# Altium PCB main_ADC_PCB.PcbDoc (part 6 of 8)
Units mm, origin at the board's own origin, x right, y up, seen from the top; angles counter-clockwise.
Board outline 150 x 100 mm, 4 copper layers (Top Layer, Layer 1, Layer 2, Bottom Layer), stack 1.62 mm thick; 535 components, 354 nets, 1725 pads, 1075 vias.
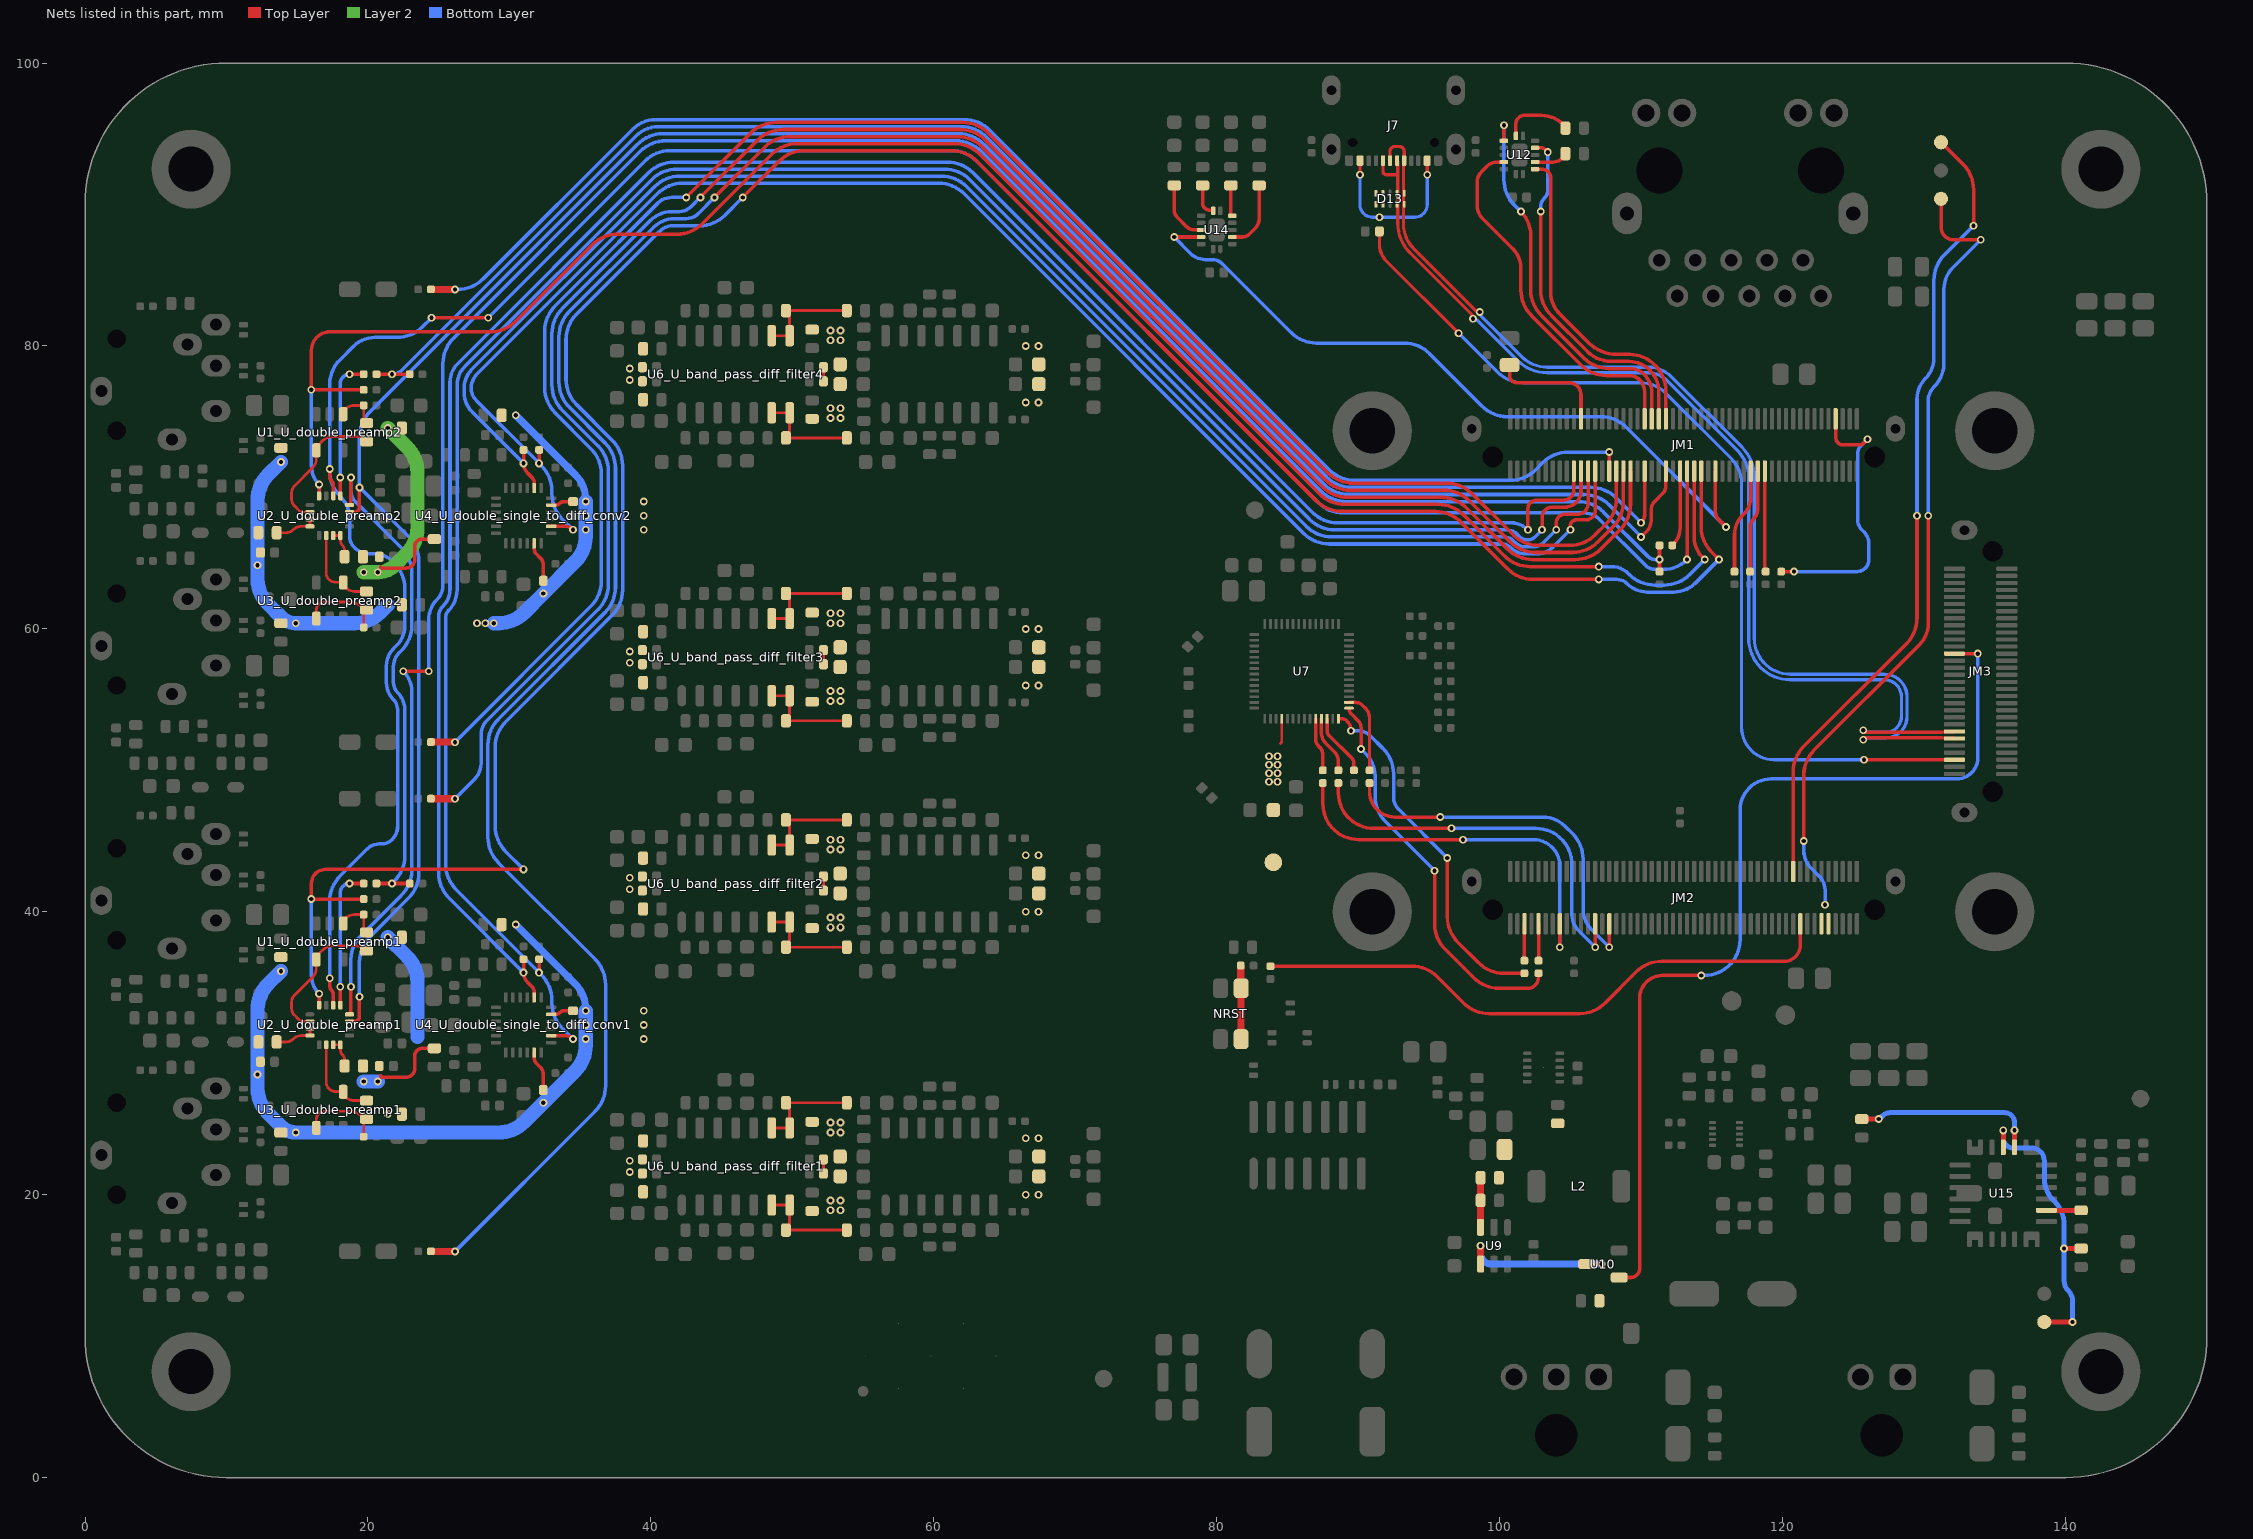
[diagram p8: the nets of this part, all layers, seen from the top]

## Via types
v1: diameter 0.55, hole 0.3, Top Layer to Bottom Layer, tented both sides, 1011 vias
v2: diameter 1, hole 0.6, Top Layer to Bottom Layer, 64 vias

## Nets (pads, with @x,y where several pads share a name; then routed paths per layer and width w, separated by ;. In a path a pad name is that pad's centre, name@x,y a point inside that pad or via, vN(x,y) a via of type N, cw(c..) or ccw(c..) an arc to the next point about the centre after c; other vN are vias at no path point) (continued)
NetJM1_41: JM1.41 U14.12 | length 53.1
  Top Layer w0.25: v1(77,87.7) U14.12@78.9,87.7 ; JM1.41@115.25,71.15 115.25,68.304 ccw(c116.104,68.304) 115.5,67.7 v1(116,67.2)
  Bottom Layer w0.25: v1(77,87.7) 78.176,86.524 ccw(c79.2,87.549) 79.2,86.1 79.676,86.1 cw(c79.676,85.076) 80.4,85.8 85.256,80.944 ccw(c87.052,82.74) 87.052,80.2 93.248,80.2 cw(c93.248,77.66) 95.044,79.456 98.756,75.744 ccw(c100.552,77.54) 100.552,75 107.148,75 cw(c107.148,72.46) 108.944,74.256 v1(116,67.2)
NetJM1_45: JM1.45 R15_U_double_preamp1.1 U2_U_double_preamp1.16 | length 178.3
  Top Layer w0.25: U2_U_double_preamp1.16@16.55,33.4 v1(16.55,34.2) ; R15_U_double_preamp1.1@19.7,40.9 v1(16,40.9) 16,42 cw(c17,42) 17,43 v1(31,43) ; v1(46.5,90.5) 49.056,93.056 cw(c50.852,91.26) 50.852,93.8 61.248,93.8 cw(c61.248,91.26) 63.044,93.056 87.056,69.044 ccw(c88.852,70.84) 88.852,68.3 95.448,68.3 cw(c95.448,65.76) 97.244,67.556 100.556,64.244 ccw(c102.352,66.04) 102.352,63.5 v1(107,63.5) ; JM1.45@114.25,71.15 114.25,67.202 ccw(c116.79,67.202) 114.994,65.406 v1(115.5,64.9)
  Bottom Layer w0.25: v1(16,40.9) 16,35.528 ccw(c17.878,35.528) v1(16.55,34.2) ; v1(31,43) 29.744,44.256 cw(c31.54,46.052) 29,46.052 29,51.648 cw(c31.54,51.648) 29.744,53.444 37.256,60.956 ccw(c35.46,62.752) 38,62.752 38,71.548 ccw(c35.46,71.548) 37.256,73.344 34.744,75.856 cw(c36.54,77.652) 34,77.652 34,80.448 cw(c36.54,80.448) 34.744,82.244 40.576,88.076 cw(c41.6,87.051) 41.6,88.5 43.448,88.5 ccw(c43.448,91.04) 45.244,89.244 v1(46.5,90.5) ; v1(107,63.5) 108.276,63.5 cw(c108.276,62.476) 109,63.2 ccw(c110.449,64.649) 110.449,62.6 112.289,62.6 ccw(c112.289,64.799) 113.844,63.244 v1(115.5,64.9)
NetJM1_47: JM1.47 R15_U_double_preamp2.1 U2_U_double_preamp2.16 | length 137.9
  Top Layer w0.25: U2_U_double_preamp2.16@16.55,69.4 v1(16.55,70.2) ; R15_U_double_preamp2.1@19.7,76.9 v1(16,76.9) 16,79.7 cw(c17.3,79.7) 17.3,81 28.648,81 ccw(c28.648,83.54) 30.444,81.744 35.856,87.156 cw(c37.652,85.36) 37.652,87.9 41.848,87.9 ccw(c41.848,90.44) 43.644,88.644 48.556,93.556 cw(c50.352,91.76) 50.352,94.3 61.448,94.3 cw(c61.448,91.76) 63.244,93.556 87.256,69.544 ccw(c89.052,71.34) 89.052,68.8 95.648,68.8 cw(c95.648,66.26) 97.444,68.056 100.356,65.144 ccw(c102.152,66.94) 102.152,64.4 v1(107,64.4) ; JM1.47@113.75,71.15 113.75,66.521 ccw(c115.852,66.521) 114.366,65.034 v1(114.5,64.9)
  Bottom Layer w0.25: v1(16,76.9) 16,71.528 ccw(c17.878,71.528) v1(16.55,70.2) ; v1(107,64.4) 107.893,64.4 cw(c107.893,62.693) 109.1,63.9 109.156,63.844 ccw(c110.952,65.64) 110.952,63.1 111.648,63.1 ccw(c111.648,65.64) 113.444,63.844 v1(114.5,64.9)
NetJM1_51: JM1.51 R126.2 | length 5.4
  Top Layer w0.25: R126.2@112.2,65.9 112.271,65.971 ccw(c111.114,67.128) 112.75,67.128 JM1.51@112.75,71.15
NetJM1_56: JM1.56 U12.2 | length 23.3
  Top Layer w0.25: U12.2@102.5,92.5 103,92.5 cw(c103,91.9) 103.6,91.9 103.6,83.852 ccw(c105.874,83.852) 104.265,82.245 106.263,80.247 ccw(c108.308,82.292) 108.308,79.4 108.31,79.4 109.2,79.4 cw(c109.2,76.937) 110.941,78.679 110.99,78.631 cw(c109.154,76.795) 111.75,76.795 JM1.56@111.75,74.85
NetJM1_58: JM1.58 U12.5 | length 24.8
  Top Layer w0.25: U12.5@102.5,94 102.959,94 cw(c102.959,93.659) 103.2,93.9 v1(103.4,93.7) ; v1(102.9,89.5) 102.9,83.952 ccw(c105.44,83.952) 103.644,82.156 106.186,79.614 ccw(c107.879,81.305) 107.881,78.912 109.123,78.912 cw(c109.123,76.823) 110.6,78.3 cw(c109.031,76.731) 111.25,76.731 JM1.58@111.25,74.85
  Bottom Layer w0.25: v1@102.9,89.6 102.9,89.776 cw(c103.924,89.776) 103.2,90.5 ccw(c102.717,90.983) 103.4,90.983 v1(103.4,93.7)
NetJM1_60: JM1.60 U12.9 | length 27.4
  Top Layer w0.25: U12.9@100.3,94.5 v1(100.3,95.6) ; v1(101.5,89.5) cw(c99.81,87.81) 102.2,87.81 102.2,83.952 ccw(c104.74,83.952) 102.944,82.156 105.956,79.144 ccw(c107.752,80.94) 107.752,78.4 109.234,78.4 cw(c109.234,77.034) 110.2,78 cw(c108.872,76.672) 110.75,76.672 JM1.60@110.75,74.85
  Bottom Layer w0.25: v1(100.3,95.6) 100.3,91.752 ccw(c102.84,91.752) 101.044,89.956 v1(101.5,89.5)
NetJM1_62: JM1.62 U12.12 | length 25.6
  Top Layer w0.25: U12.12@100.3,93 99.824,93 ccw(c99.824,91.976) 99.1,92.7 98.754,92.354 ccw(c99.607,91.5) 98.4,91.5 98.4,89.966 ccw(c99.766,89.966) 98.8,89 100.934,86.866 cw(c99.569,85.5) 101.5,85.5 101.5,83.952 ccw(c104.04,83.952) 102.244,82.156 105.756,78.644 ccw(c107.552,80.44) 107.552,77.9 109.176,77.9 cw(c109.176,76.876) 109.9,77.6 cw(c109.055,76.755) 110.25,76.755 JM1.62@110.25,74.85
NetJM1_65: JM1.65 R120.1 | length 177
  Top Layer w0.25: v1(44.5,90.5) 48.056,94.056 cw(c49.852,92.26) 49.852,94.8 61.648,94.8 cw(c61.648,92.26) 63.444,94.056 87.456,70.044 ccw(c89.252,71.84) 89.252,69.3 95.848,69.3 cw(c95.848,66.76) 97.644,68.556 100.556,65.644 ccw(c102.352,67.44) 102.352,64.9 105.348,64.9 ccw(c105.348,67.44) 107.144,65.644 108.506,67.006 ccw(c106.71,68.802) 109.25,68.802 JM1.65@109.25,71.15
  Top Layer w0.5: R120.1@24.474,15.99 v1(26.15,15.99)
  Bottom Layer w0.25: v1(26.15,15.99) 36.056,25.896 ccw(c34.26,27.692) 36.8,27.692 36.8,34.848 ccw(c34.26,34.848) 36.056,36.644 29.221,43.479 cw(c31.017,45.275) 28.477,45.275 28.477,51.825 cw(c31.017,51.825) 29.221,53.621 36.756,61.156 ccw(c34.96,62.952) 37.5,62.952 37.5,71.348 ccw(c34.96,71.348) 36.756,73.144 34.244,75.656 cw(c36.04,77.452) 33.5,77.452 33.5,80.648 cw(c36.04,80.648) 34.244,82.444 40.164,88.364 cw(c41.7,86.827) 41.7,89 42.5,89 ccw(c42.5,90.207) 43.354,89.354 v1(44.5,90.5)
NetJM1_67: JM1.67 R118.1 | length 138.2
  Top Layer w0.25: v1(43.5,90.5) 47.556,94.556 cw(c49.352,92.76) 49.352,95.3 61.848,95.3 cw(c61.848,92.76) 63.644,94.556 87.656,70.544 ccw(c89.452,72.34) 89.452,69.8 96.048,69.8 cw(c96.048,67.26) 97.844,69.056 100.756,66.144 ccw(c102.552,67.94) 102.552,65.4 105.148,65.4 ccw(c105.148,67.94) 106.944,66.144 108.006,67.206 ccw(c106.21,69.002) 108.75,69.002 JM1.67@108.75,71.15
  Top Layer w0.5: R118.1@24.474,47.99 v1(26.15,47.99)
  Bottom Layer w0.25: v1(26.15,47.99) 27.533,49.373 ccw(c26.407,50.5) 28,50.5 28,52.534 cw(c29.366,52.534) 28.4,53.5 36.256,61.356 ccw(c34.46,63.152) 37,63.152 37,71.148 ccw(c34.46,71.148) 36.256,72.944 33.744,75.456 cw(c35.54,77.252) 33,77.252 33,80.848 cw(c35.54,80.848) 33.744,82.644 39.964,88.864 cw(c41.5,87.327) 41.5,89.5 42,89.5 ccw(c42,90.707) 42.854,89.854 v1(43.5,90.5)
NetJM1_69: JM1.69 R79.1 | length 134.2
  Top Layer w0.25: v1(42.5,90.5) 47.056,95.056 cw(c48.852,93.26) 48.852,95.8 62.048,95.8 cw(c62.048,93.26) 63.844,95.056 87.856,71.044 ccw(c89.652,72.84) 89.652,70.3 96.248,70.3 cw(c96.248,67.76) 98.044,69.556 100.956,66.644 ccw(c102.752,68.44) 102.752,65.9 104.948,65.9 ccw(c104.948,68.44) 106.744,66.644 107.506,67.406 ccw(c105.71,69.202) 108.25,69.202 JM1.69@108.25,71.15
  Top Layer w0.5: R79.1@24.474,51.99 v1(26.15,51.99)
  Bottom Layer w0.25: v1(26.15,51.99) 35.756,61.596 ccw(c33.96,63.392) 36.5,63.392 36.5,70.948 ccw(c33.96,70.948) 35.756,72.744 33.244,75.256 cw(c35.04,77.052) 32.5,77.052 32.5,81.048 cw(c35.04,81.048) 33.244,82.844 34.9,84.5 40.5,90.1 cw(c41.466,89.134) 41.466,90.5 v1(42.5,90.5)
NetJM1_71: JM1.71 R77.1 | length 100.3
  Top Layer w0.245: JM1.71@107.75,71.15 v1(107.75,72.5)
  Top Layer w0.5: R77.1@24.474,83.99 v1(26.15,83.99)
  Bottom Layer w0.25: v1(26.15,83.99) 26.338,83.99 ccw(c26.338,86.53) 28.134,84.734 38.727,95.327 cw(c40.352,93.701) 40.352,96 62.148,96 cw(c62.148,93.46) 63.944,95.256 87.956,71.244 ccw(c89.752,73.04) 89.752,70.5 100.748,70.5 ccw(c100.748,73.04) 102.544,71.244 103.056,71.756 cw(c104.852,69.96) 104.852,72.5 v1(107.75,72.5)
NetJM1_75: JM1.75 R33_U_double_single_to_diff_conv2.1 U4_U_double_single_to_diff_conv2.14 | length 115.5
  Top Layer w0.25: v1(32.1,71.7) R33_U_double_single_to_diff_conv2.1@32.1,72.65 ; U4_U_double_single_to_diff_conv2.14@32.952,67.25 33.896,67.25 cw(c33.896,66.396) v1(34.5,67) ; v1(105,67) 105,67.3 cw(c105.4,67.3) 105.4,67.7 106.1,67.7 ccw(c106.1,68.35) 106.75,68.35 JM1.75@106.75,71.15
  Bottom Layer w0.25: v1(32.1,71.7) 27.654,76.146 cw(c28.507,77) 27.3,77 cw(c28.749,77) 27.724,78.024 40.456,90.756 cw(c42.252,88.96) 42.252,91.5 60.348,91.5 cw(c60.348,88.96) 62.144,90.756 86.156,66.744 ccw(c87.952,68.54) 87.952,66 100.217,66 cw(c100.217,65.317) 100.7,65.8 100.705,65.795 ccw(c101.9,66.99) 101.9,65.3 ; v1@32.256,71.544 cw(c30.46,69.748) 33,69.748 33,69.552 ccw(c35.54,69.552) 33.744,67.756 v1(34.5,67) ; 101.983,65.3 102.6,65.3 ccw(c102.6,66.99) 103.795,65.795 v1(105,67)
NetJM1_77: JM1.77 R20_U_double_single_to_diff_conv2.2 U4_U_double_single_to_diff_conv2.20 | length 110.4
  Top Layer w0.25: R20_U_double_single_to_diff_conv2.2@31,72.65 v1(31,71.7) ccw(c31.966,71.7) 31.283,71.017 31.6,70.7 cw(c31.238,70.338) 31.75,70.338 U4_U_double_single_to_diff_conv2.20@31.75,69.952 ; v1(104,67) 104,67.5 cw(c104.6,67.5) 104.6,68.1 105.5,68.1 ccw(c105.5,68.85) 106.25,68.85 JM1.77@106.25,71.15
  Bottom Layer w0.25: v1(31,71.7) 27.366,75.334 cw(c28.731,76.7) 26.8,76.7 26.8,77.029 cw(c28.661,77.029) 27.345,78.345 40.256,91.256 cw(c42.052,89.46) 42.052,92 60.53,92 cw(c60.53,89.46) 62.326,91.256 86.338,67.244 ccw(c88.134,69.04) 88.134,66.5 100.317,66.5 cw(c100.317,65.576) 100.971,66.229 101.1,66.1 ccw(c101.824,66.824) 101.824,65.8 102.4,65.8 ccw(c102.4,66.766) 103.083,66.083 v1(104,67)
NetJM1_79: JM1.79 R33_U_double_single_to_diff_conv1.1 U4_U_double_single_to_diff_conv1.14 | length 152.6
  Top Layer w0.25: v1(32.1,35.7) R33_U_double_single_to_diff_conv1.1@32.1,36.65 ; U4_U_double_single_to_diff_conv1.14@32.952,31.25 33.896,31.25 cw(c33.896,30.396) v1(34.5,31) ; v1(103,67) 103,67.9 cw(c103.7,67.9) 103.7,68.6 104.6,68.6 ccw(c104.6,69.75) 105.75,69.75 JM1.79@105.75,71.15
  Bottom Layer w0.25: v1(34.5,31) 33.744,31.756 cw(c35.54,33.552) 33,33.552 33,33.748 ccw(c30.46,33.748) 32.256,35.544 v1(32.1,35.7) 26.244,41.556 cw(c28.04,43.352) 25.5,43.352 25.5,60.817 cw(c26.183,60.817) 25.7,61.3 ccw(c24.251,62.749) 26.3,62.749 26.3,77.231 cw(c28.157,77.231) 26.844,78.544 40.056,91.756 cw(c41.852,89.96) 41.852,92.5 60.748,92.5 cw(c60.748,89.96) 62.544,91.756 86.556,67.744 ccw(c88.352,69.54) 88.352,67 100.476,67 cw(c100.476,65.919) 101.223,66.7 ; 101.223,66.7 cw(c101.05,66.52) 101.25,66.669 ccw(c101.964,67.195) 101.556,66.408 ccw(c102,67.266) 102,66.3 ccw(c102,67.024) 102.513,66.513 v1(103,67)
NetJM1_81: JM1.81 R20_U_double_single_to_diff_conv1.2 U4_U_double_single_to_diff_conv1.20 | length 147.5
  Top Layer w0.25: R20_U_double_single_to_diff_conv1.2@31,36.65 v1(31,35.7) ccw(c31.966,35.7) 31.283,35.017 31.6,34.7 cw(c31.238,34.338) 31.75,34.338 U4_U_double_single_to_diff_conv1.20@31.75,33.952 ; v1(102,67) 102,68.5 cw(c102.6,68.5) 102.6,69.1 104.5,69.1 ccw(c104.5,69.85) 105.25,69.85 JM1.81@105.25,71.15
  Bottom Layer w0.25: v1(31,35.7) 25.744,40.956 cw(c27.54,42.752) 25,42.752 25,60.876 cw(c26.024,60.876) 25.3,61.6 ccw(c24.093,62.807) 25.8,62.807 25.8,77.431 cw(c27.657,77.431) 26.344,78.744 39.856,92.256 cw(c41.652,90.46) 41.652,93 60.948,93 cw(c60.948,90.46) 62.744,92.256 86.756,68.244 ccw(c88.552,70.04) 88.552,67.5 100.793,67.5 cw(c100.793,65.793) v1(102,67)
NetJM2_9: JM2.9 JM2.11 PWR_M1.1 | length 57.5
  Top Layer w0.25: v1(121.5,45) 121.5,49.648 cw(c124.04,49.648) 122.244,51.444 129.656,58.856 ccw(c128.101,60.411) 130.3,60.411 v1(130.3,68) ; PWR_M1.1@131.2,90.4 131.2,88.4 ccw(c132.1,88.4) 132.1,87.5 v1(134,87.5)
  Bottom Layer w0.25: v1(121.5,45) 121.5,44.3 ccw(c123.19,44.3) 121.995,43.105 122.6,42.5 cw(c121.634,41.534) 123,41.534 v1(123,40.5) ; v1(130.3,68) 130.3,76.134 cw(c131.666,76.134) 130.7,77.1 ccw(c129.01,78.79) 131.4,78.79 131.4,84 cw(c133.573,84) 132.036,85.536 v1(134,87.5)
NetJM2_17: JM2.17 R110.1 | length 42.1
  Top Layer w0.245: R110.1@83.8,36.15 93.798,36.15 cw(c93.798,33.61) 95.594,35.406 97.456,33.544 ccw(c99.252,35.34) 99.252,32.8 105.648,32.8 ccw(c105.648,35.34) 107.444,33.544 109.656,35.756 cw(c111.452,33.96) 111.452,36.5 120.1,36.5 ccw(c120.1,37.65) 121.25,37.65 JM2.17@121.25,39.15
NetJM2_20: JM2.20 PWR_M3.1 | length 57.2
  Top Layer w0.25: JM2.20@120.75,42.85 120.75,49.898 cw(c123.29,49.898) 121.494,51.694 128.756,58.956 ccw(c126.96,60.752) 129.5,60.752 v1(129.5,68) ; PWR_M3.1@131.2,94.4 132.756,92.844 cw(c130.96,91.048) 133.5,91.048 v1(133.5,88.5)
  Bottom Layer w0.25: v1(129.5,68) 129.5,76.251 cw(c131.549,76.251) 130.1,77.7 ccw(c128.651,79.149) 130.7,79.149 130.7,84.648 cw(c133.24,84.648) 131.444,86.444 v1(133.5,88.5)
NetJM3_26: JM3.26 U10.1 | length 67.5
  Top Layer w0.25: U10.1@108.45,14.15 109.25,14.15 ccw(c109.25,14.8) 109.9,14.8 109.9,33.9 cw(c111.5,33.9) 111.5,35.5 v1@114.3,35.5 ; JM3.26@132.15,58.25 v1(133.8,58.25)
  Bottom Layer w0.25: v1(114.25,35.5) 114.46,35.5 ccw(c114.46,38.04) 117,38.04 117,47.2 cw(c119.2,47.2) 119.2,49.4 132.3,49.4 ccw(c132.3,50.9) 133.8,50.9 v1(133.8,58.25)
NetPG_1: PG.1 R114.2 U15.4 | length 20.7
  Top Layer w0.35: U15.4@135.6,23.35 v1(135.6,24.55) ; PG.1@138.5,11 v1(140.5,11) ; v1(139.9,16.2) R114.2@141.1,16.2
  Bottom Layer w0.35: v1(135.6,24.55) 135.6,24 ccw(c136.3,24) 136.3,23.3 137.6,23.3 cw(c137.6,22.4) 138.5,22.4 138.5,21.166 ccw(c140.724,21.166) 139.15,19.594 139.216,19.528 cw(c137.565,17.877) 139.9,17.877 v1(139.9,16.2) 139.9,13.924 ccw(c140.924,13.924) 140.2,13.2 cw(c139.476,12.476) 140.5,12.476 v1(140.5,11)
NetR7_U_double_preamp1_2: R7_U_double_preamp1.2 R11_U_double_preamp1.1 U1_U_double_preamp1.1 | length 2.6
  Top Layer w0.2: U1_U_double_preamp1.1@18.393,39.526 cw(c19.054,38.864) 19.054,39.8 R7_U_double_preamp1.2@19.7,39.8 19.7,38.635 cw(c19.66,38.635) R11_U_double_preamp1.1@19.688,38.607
NetR7_U_double_preamp2_2: R7_U_double_preamp2.2 R11_U_double_preamp2.1 U1_U_double_preamp2.1 | length 2.6
  Top Layer w0.2: U1_U_double_preamp2.1@18.393,75.526 cw(c19.054,74.864) 19.054,75.8 R7_U_double_preamp2.2@19.7,75.8 19.7,74.635 cw(c19.66,74.635) R11_U_double_preamp2.1@19.688,74.607
NetR11_U_double_preamp1_2: R11_U_double_preamp1.2 U1_U_double_preamp1.4 U2_U_double_preamp1.2 | length 10
  Top Layer w0.2: U2_U_double_preamp1.2@15.9,32.25 15.462,32.25 cw(c15.462,32.762) 15.1,32.4 14.799,32.701 14.798,32.702 cw(c15.273,33.179) 14.6,33.181 14.6,33.615 cw(c15.283,33.617) 14.8,34.1 16.1,35.4 ccw(c15.496,36.004) 16.35,36.004 U1_U_double_preamp1.4@16.35,36.625 cw(c16.893,36.625) 16.509,37.009 16.8,37.3 cw(c17.524,36.576) 17.524,37.6 19.055,37.6 cw(c19.055,36.405) R11_U_double_preamp1.2@19.9,37.25
NetR11_U_double_preamp2_2: R11_U_double_preamp2.2 U1_U_double_preamp2.4 U2_U_double_preamp2.2 | length 10
  Top Layer w0.2: U2_U_double_preamp2.2@15.9,68.25 15.462,68.25 cw(c15.462,68.762) 15.1,68.4 14.799,68.701 14.798,68.702 cw(c15.273,69.179) 14.6,69.181 14.6,69.615 cw(c15.283,69.617) 14.8,70.1 16.1,71.4 ccw(c15.496,72.004) 16.35,72.004 U1_U_double_preamp2.4@16.35,72.625 cw(c16.893,72.625) 16.509,73.009 16.8,73.3 cw(c17.524,72.576) 17.524,73.6 19.055,73.6 cw(c19.055,72.405) R11_U_double_preamp2.2@19.9,73.25
NetR14_U_double_preamp1_1: R14_U_double_preamp1.1 U2_U_double_preamp1.3 U2_U_double_preamp1.4 | length 3
  Top Layer w0.2: R14_U_double_preamp1.1@13.55,30.8 14.217,30.8 ccw(c14.217,31.483) 14.7,31 cw(c15.304,30.396) 15.304,31.25 U2_U_double_preamp1.4@15.9,31.25 U2_U_double_preamp1.3@15.9,31.75
NetR14_U_double_preamp2_1: R14_U_double_preamp2.1 U2_U_double_preamp2.3 U2_U_double_preamp2.4 | length 3
  Top Layer w0.2: R14_U_double_preamp2.1@13.55,66.8 14.217,66.8 ccw(c14.217,67.483) 14.7,67 cw(c15.304,66.396) 15.304,67.25 U2_U_double_preamp2.4@15.9,67.25 U2_U_double_preamp2.3@15.9,67.75
NetR16_U_double_preamp1_1: R16_U_double_preamp1.1 U2_U_double_preamp1.7 U2_U_double_preamp1.8 | length 2.1
  Top Layer w0.2: U2_U_double_preamp1.7@17.55,30.6 U2_U_double_preamp1.8@18.05,30.6 18.05,30.262 ccw(c18.562,30.262) 18.2,29.9 cw(c17.838,29.538) 18.35,29.538 R16_U_double_preamp1.1@18.35,29.1
NetR16_U_double_preamp2_1: R16_U_double_preamp2.1 U2_U_double_preamp2.7 U2_U_double_preamp2.8 | length 2.1
  Top Layer w0.2: U2_U_double_preamp2.7@17.55,66.6 U2_U_double_preamp2.8@18.05,66.6 18.05,66.262 ccw(c18.562,66.262) 18.2,65.9 cw(c17.838,65.538) 18.35,65.538 R16_U_double_preamp2.1@18.35,65.1
NetR18_U_double_preamp1_2: R18_U_double_preamp1.2 R121_U_double_preamp1.2 U3_U_double_preamp1.1 | length 5.7
  Top Layer w0.2: U3_U_double_preamp1.1@16.35,24.725 16.35,25.338 cw(c16.862,25.338) 16.5,25.7 cw(c16.983,25.217) 16.983,25.9 18.653,25.9 cw(c18.653,24.508) 19.638,25.492 cw(c19.487,25.342) 19.7,25.342 R18_U_double_preamp1.2@19.7,24.1
NetR18_U_double_preamp2_2: R18_U_double_preamp2.2 R121_U_double_preamp2.2 U3_U_double_preamp2.1 | length 5.7
  Top Layer w0.2: U3_U_double_preamp2.1@16.35,60.725 16.35,61.338 cw(c16.862,61.338) 16.5,61.7 cw(c16.983,61.217) 16.983,61.9 18.653,61.9 cw(c18.653,60.508) 19.638,61.492 cw(c19.487,61.342) 19.7,61.342 R18_U_double_preamp2.2@19.7,60.1
NetR34_U_band_pass_diff_filter1_1: R34_U_band_pass_diff_filter1.1 R38_U_band_pass_diff_filter1.2 U6_U_band_pass_diff_filter1.6 U6_U_band_pass_diff_filter1.7 | length 7.3
  Top Layer w0.2: U6_U_band_pass_diff_filter1.6@48.54,19.275 U6_U_band_pass_diff_filter1.7@49.81,19.275 R34_U_band_pass_diff_filter1.1@49.81,17.5 ; R34_U_band_pass_diff_filter1.1@49.55,17.5 R34_U_band_pass_diff_filter1.1@49.81,17.5 ; R38_U_band_pass_diff_filter1.2@53.85,17.5 R34_U_band_pass_diff_filter1.1@49.81,17.5
NetR34_U_band_pass_diff_filter2_1: R34_U_band_pass_diff_filter2.1 R38_U_band_pass_diff_filter2.2 U6_U_band_pass_diff_filter2.6 U6_U_band_pass_diff_filter2.7 | length 7.3
  Top Layer w0.2: U6_U_band_pass_diff_filter2.6@48.54,39.275 U6_U_band_pass_diff_filter2.7@49.81,39.275 R34_U_band_pass_diff_filter2.1@49.81,37.5 ; R34_U_band_pass_diff_filter2.1@49.55,37.5 R34_U_band_pass_diff_filter2.1@49.81,37.5 ; R38_U_band_pass_diff_filter2.2@53.85,37.5 R34_U_band_pass_diff_filter2.1@49.81,37.5
NetR34_U_band_pass_diff_filter3_1: R34_U_band_pass_diff_filter3.1 R38_U_band_pass_diff_filter3.2 U6_U_band_pass_diff_filter3.6 U6_U_band_pass_diff_filter3.7 | length 7.3
  Top Layer w0.2: U6_U_band_pass_diff_filter3.6@48.54,55.275 U6_U_band_pass_diff_filter3.7@49.81,55.275 R34_U_band_pass_diff_filter3.1@49.81,53.5 ; R34_U_band_pass_diff_filter3.1@49.55,53.5 R34_U_band_pass_diff_filter3.1@49.81,53.5 ; R38_U_band_pass_diff_filter3.2@53.85,53.5 R34_U_band_pass_diff_filter3.1@49.81,53.5
NetR34_U_band_pass_diff_filter4_1: R34_U_band_pass_diff_filter4.1 R38_U_band_pass_diff_filter4.2 U6_U_band_pass_diff_filter4.6 U6_U_band_pass_diff_filter4.7 | length 7.3
  Top Layer w0.2: U6_U_band_pass_diff_filter4.6@48.54,75.275 U6_U_band_pass_diff_filter4.7@49.81,75.275 R34_U_band_pass_diff_filter4.1@49.81,73.5 ; R34_U_band_pass_diff_filter4.1@49.55,73.5 R34_U_band_pass_diff_filter4.1@49.81,73.5 ; R38_U_band_pass_diff_filter4.2@53.85,73.5 R34_U_band_pass_diff_filter4.1@49.81,73.5
NetR43_U_band_pass_diff_filter1_1: R43_U_band_pass_diff_filter1.1 R47_U_band_pass_diff_filter1.2 U6_U_band_pass_diff_filter1.8 U6_U_band_pass_diff_filter1.9 | length 7.3
  Top Layer w0.2: U6_U_band_pass_diff_filter1.9@48.54,24.725 U6_U_band_pass_diff_filter1.8@49.81,24.725 R43_U_band_pass_diff_filter1.1@49.81,26.5 ; R43_U_band_pass_diff_filter1.1@49.55,26.5 R43_U_band_pass_diff_filter1.1@49.81,26.5 ; R47_U_band_pass_diff_filter1.2@53.85,26.5 R43_U_band_pass_diff_filter1.1@49.81,26.5
NetR43_U_band_pass_diff_filter2_1: R43_U_band_pass_diff_filter2.1 R47_U_band_pass_diff_filter2.2 U6_U_band_pass_diff_filter2.8 U6_U_band_pass_diff_filter2.9 | length 7.3
  Top Layer w0.2: U6_U_band_pass_diff_filter2.9@48.54,44.725 U6_U_band_pass_diff_filter2.8@49.81,44.725 R43_U_band_pass_diff_filter2.1@49.81,46.5 ; R43_U_band_pass_diff_filter2.1@49.55,46.5 R43_U_band_pass_diff_filter2.1@49.81,46.5 ; R47_U_band_pass_diff_filter2.2@53.85,46.5 R43_U_band_pass_diff_filter2.1@49.81,46.5
NetR43_U_band_pass_diff_filter3_1: R43_U_band_pass_diff_filter3.1 R47_U_band_pass_diff_filter3.2 U6_U_band_pass_diff_filter3.8 U6_U_band_pass_diff_filter3.9 | length 7.3
  Top Layer w0.2: U6_U_band_pass_diff_filter3.9@48.54,60.725 U6_U_band_pass_diff_filter3.8@49.81,60.725 R43_U_band_pass_diff_filter3.1@49.81,62.5 ; R43_U_band_pass_diff_filter3.1@49.55,62.5 R43_U_band_pass_diff_filter3.1@49.81,62.5 ; R47_U_band_pass_diff_filter3.2@53.85,62.5 R43_U_band_pass_diff_filter3.1@49.81,62.5
NetR43_U_band_pass_diff_filter4_1: R43_U_band_pass_diff_filter4.1 R47_U_band_pass_diff_filter4.2 U6_U_band_pass_diff_filter4.8 U6_U_band_pass_diff_filter4.9 | length 7.3
  Top Layer w0.2: U6_U_band_pass_diff_filter4.9@48.54,80.725 U6_U_band_pass_diff_filter4.8@49.81,80.725 R43_U_band_pass_diff_filter4.1@49.81,82.5 ; R43_U_band_pass_diff_filter4.1@49.55,82.5 R43_U_band_pass_diff_filter4.1@49.81,82.5 ; R47_U_band_pass_diff_filter4.2@53.85,82.5 R43_U_band_pass_diff_filter4.1@49.81,82.5
NetR69_1: R69.1 U7.54 | length 4.4
  Top Layer w0.245: U7.54@87.8,53.65 87.8,53.083 87.8,52.8 ccw(c88.283,52.8) 87.941,52.459 89.559,50.841 cw(c89.217,50.5) 89.7,50.5 R69.1@89.7,50
NetR80_U_double_preamp1_1: R80_U_double_preamp1.1 R125.1 U2_U_double_preamp2.12 | length 35.5
  Top Layer w0.25: U2_U_double_preamp2.12@18.7,68.75 ccw(c18.7,68.85) 18.8,68.85 v1(18.8,70.7) ; R80_U_double_preamp1.1@20.6,42 v1(21.7,42) R125.1@22.95,42
  Bottom Layer w0.25: v1(18.8,70.7) 18.8,69.724 ccw(c19.824,69.724) 19.1,69 22.356,65.744 cw(c20.56,63.948) 23.1,63.948 23.1,60.252 cw(c20.56,60.252) 22.356,58.456 22.2,58.3 ccw(c23.166,57.334) 21.8,57.334 21.8,56.224 ccw(c22.824,56.224) 22.1,55.5 cw(c20.893,54.293) 22.6,54.293 22.6,43.952 cw(c20.06,43.952) 21.856,42.156 v1(21.7,42)
NetR80_U_double_preamp1_2: R80_U_double_preamp1.2 U2_U_double_preamp1.13 | length 10
  Top Layer w0.25: U2_U_double_preamp1.13@18.05,33.4 v1(18.05,34.7) ; v1(18.7,42) R80_U_double_preamp1.2@19.7,42
  Bottom Layer w0.25: v1(18.05,34.7) 18.05,41.35 cw(c18.7,41.35) v1(18.7,42)
NetR80_U_double_preamp2_2: R80_U_double_preamp2.2 U2_U_double_preamp2.13 | length 10
  Top Layer w0.25: U2_U_double_preamp2.13@18.05,69.4 v1(18.05,70.7) ; v1(18.7,78) R80_U_double_preamp2.2@19.7,78
  Bottom Layer w0.25: v1(18.05,70.7) 18.05,77.35 cw(c18.7,77.35) v1(18.7,78)
NetR81_1: R81.1 R82.2 U9.3 | length 3.5
  Top Layer w0.5: U9.3@98.65,17.7 R81.1@98.65,19.6 R82.2@98.65,21.2
NetR83_2: R83.2 U9.4 U10.3 | length 10.8
  Top Layer w0.5: U9.4@98.65,15.1 v1(98.65,16.4)
  Bottom Layer w0.5: v1(98.65,16.4) 98.65,15.85 ccw(c99.4,15.85) 99.4,15.1 v1(107.2,15.1)
NetR87_2: R87.2 U12.3 | length 2
  Top Layer w0.25: U12.3@102.5,93 103.765,93 ccw(c103.765,93.964) R87.2@104.446,93.282
NetR88_2: R88.2 U12.8 | length 4.7
  Top Layer w0.25: U12.8@101.15,94.85 101.15,95.738 cw(c101.662,95.738) 101.3,96.1 cw(c101.783,95.617) 101.783,96.3 102.951,96.3 cw(c102.951,94.142) R88.2@104.478,95.668
NetR98_2: R98.2 U14.3 | length 5
  Top Layer w0.25: U14.3@81.1,87.7 81.817,87.7 ccw(c81.817,88.383) 82.3,87.9 82.717,88.317 ccw(c82.034,89) 83,89 R98.2@83,91.35
NetR99_2: R99.2 U14.6 | length 2.2
  Top Layer w0.25: R99.2@81,91.35 81,89.3 ccw(c81.1,89.3) U14.6@81.1,89.2
NetR100_2: R100.2 U14.8 | length 2.3
  Top Layer w0.25: R100.2@79,91.35 79,90.1 ccw(c79.5,90.1) 79.5,89.6 79.7,89.6 cw(c79.7,89.55) U14.8@79.75,89.55
NetR101_2: R101.2 U14.11 | length 4.3
  Top Layer w0.25: R101.2@77,91.35 77,89.6 ccw(c77.724,89.6) 77.212,89.088 77.9,88.4 ccw(c78.383,88.883) 78.383,88.2 U14.11@78.9,88.2
NetR111_2: R111.2 U15.3 | length 13.1
  Top Layer w0.35: R111.2@125.6,25.35 v1(126.8,25.35) ; U15.3@136.4,23.35 v1(136.4,24.55)
  Bottom Layer w0.35: v1(126.8,25.35) ccw(c126.8,25.471) 126.885,25.385 127.1,25.6 cw(c127.583,25.117) 127.583,25.8 135.7,25.8 cw(c135.7,25.1) 136.4,25.1 v1(136.4,24.55)
NetR115_1: R115.1 U15.22 | length 2.5
  Top Layer w0.35: U15.22@138.65,18.9 R115.1@141.1,18.9
NetR121_U_double_preamp1_1: R121_U_double_preamp1.1 U2_U_double_preamp1.6 U3_U_double_preamp1.4 | length 5.8
  Top Layer w0.2: U2_U_double_preamp1.6@17.05,30.6 17.05,27.95 ccw(c17.7,27.95) 17.7,27.3 18.225,27.3 cw(c18.225,27.275) U3_U_double_preamp1.4@18.25,27.275 ; U3_U_double_preamp1.4@18.411,26.922 ccw(c19.067,27.578) 19.067,26.65 R121_U_double_preamp1.1@19.9,26.65
NetR121_U_double_preamp2_1: R121_U_double_preamp2.1 U2_U_double_preamp2.6 U3_U_double_preamp2.4 | length 5.8
  Top Layer w0.2: U2_U_double_preamp2.6@17.05,66.6 17.05,63.95 ccw(c17.7,63.95) 17.7,63.3 18.225,63.3 cw(c18.225,63.275) U3_U_double_preamp2.4@18.25,63.275 ; U3_U_double_preamp2.4@18.411,62.922 ccw(c19.067,63.578) 19.067,62.65 R121_U_double_preamp2.1@19.9,62.65
NOSEQ: JM1.8 R104.2 | length 19.7
  Top Layer w0.25: R104.2@119.9,64.05 v1(120.8,64.05) ; JM1.8@123.75,74.85 123.75,73.55 ccw(c124.3,73.55) 124.3,73 125.459,73 ccw(c125.459,73.341) 125.7,73.1 v1(126,73.4)
  Bottom Layer w0.25: v1(120.8,64.05) 125.25,64.05 ccw(c125.25,64.9) 126.1,64.9 126.1,66 ccw(c124.893,66) 125.746,66.854 125.6,67 cw(c126.324,67.724) 125.3,67.724 125.3,72.4 cw(c126.024,72.4) 125.512,72.912 v1(126,73.4)
NRST_BTN: NRST.1 NRST.2 R108.2 | length 5.2
  Top Layer w0.5: NRST.1@81.7,34.625 R108.2@81.7,36.2 ; NRST.2@81.725,31 NRST.1@81.725,34.6
PRE_REG_OUT: C59.1 F2.2 L2.1 R82.1
PWR_VBAT: JM1.80 R107.2 | length 8.3
  Top Layer w0.25: R107.2@100.7,78.65 100.7,77.9 ccw(c101.2,77.9) 101.2,77.4 104.9,77.4 cw(c104.9,76.55) 105.75,76.55 JM1.80@105.75,74.85
RESET: R70.2 U7.52 | length 3.8
  Top Layer w0.245: 87,52.182 ccw(c87.657,52.182) 87.192,51.718 87.292,51.618 cw(c86.791,51.117) 87.5,51.117 87.5,51.115 R70.2@87.5,50 ; 87,52.183 U7.52@87,53.65
RESET_FPGA: JM2.85 R70.1 | length 28.1
  Top Layer w0.245: R70.1@87.5,49.1 87.5,47.64 ccw(c90.04,47.64) 90.04,45.1 v1(97.4,45.1) ; v1(104.25,37.5) JM2.85@104.25,39.15
  Bottom Layer w0.245: v1(97.4,45.1) 102.4,45.1 cw(c102.4,43.25) 104.25,43.25 v1(104.25,37.5)
SC_BOOTMODE: JM1.31 R105.2 | length 7.4
  Top Layer w0.25: R105.2@116.6,64.05 116.6,66.649 ; 116.6,66.65 cw(c118.537,66.65) 117.167,68.02 117.273,68.126 ccw(c116.123,69.277) 117.75,69.277 JM1.31@117.75,71.15
SC_EN1: JM1.27 R102.2 | length 7.1
  Top Layer w0.25: JM1.27@118.75,71.15 118.75,64.171 ccw(c118.921,64.171) R102.2@118.8,64.05
SC_PGOOD: JM1.29 R103.2 | length 7.2
  Top Layer w0.25: R103.2@117.7,64.05 117.7,67.217 cw(c118.383,67.217) 117.9,67.7 ccw(c117.055,68.545) 118.25,68.545 JM1.29@118.25,71.15
SCLK: R68.2 U7.56 | length 25.2
  Top Layer w0.245: U7.56@88.684,53.65 88.838,53.65 cw(c88.838,53.138) 89.2,53.5 89.217,53.483 cw(c88.534,52.8) v1(89.5,52.8) ; v1(96.3,43.8) 96.3,39.652 ccw(c98.84,39.652) 97.044,37.856 98.506,36.394 ccw(c100.302,38.19) 100.302,35.65 R68.2@101.75,35.65
  Bottom Layer w0.245: v1(89.5,52.8) 90,52.8 cw(c90,51.593) 90.854,52.446 91.756,51.544 cw(c89.96,49.748) 92.5,49.748 92.5,48.1 ccw(c93.707,48.1) 92.854,47.246 v1(96.3,43.8)
SCLK_FPGA: JM2.95 R68.1 | length 2.6
  Top Layer w0.245: R68.1@101.75,36.55 JM2.95@101.75,39.15
SCLK_VP: JM1.55 U2_U_double_preamp1.11 U2_U_double_preamp2.11 | length 163.9
  Top Layer w0.25: U2_U_double_preamp1.11@18.7,32.25 19.05,32.25 ccw(c19.05,32.6) 19.4,32.6 v1(19.4,34) ; U2_U_double_preamp2.11@18.7,68.25 19.05,68.25 ccw(c19.05,68.6) 19.4,68.6 v1(19.4,70) ; v1(110,66.5) 110.4,66.9 ccw(c109.676,67.624) 110.7,67.624 110.7,68.378 ; 110.7,68.379 cw(c111.583,68.379) 110.959,69.004 111.532,69.577 ccw(c111.005,70.104) 111.533,69.578 ccw(c111.005,70.104) 111.75,70.104 JM1.55@111.75,71.15
  Bottom Layer w0.25: v1(19.4,34) 19.4,36.448 cw(c21.94,36.448) 20.144,38.244 22.856,40.956 ccw(c21.06,42.752) 23.6,42.752 23.6,64.748 ccw(c21.06,64.748) 22.856,66.544 v1(19.4,70) 19.4,73.548 cw(c21.94,73.548) 20.144,75.344 39.056,94.256 cw(c40.852,92.46) 40.852,95 61.748,95 cw(c61.748,92.46) 63.544,94.256 87.556,70.244 ccw(c89.352,72.04) 89.352,69.5 105.948,69.5 cw(c105.948,66.96) 107.744,68.756 v1(110,66.5)
SDI: R75.2 U7.1 | length 27.8
  Top Layer w0.245: U7.1@89.35,54.356 ccw(c89.848,54.356) 89.496,54.004 89.988,53.512 cw(c89.476,53) 90.2,53 v1(90.2,51.5) ; v1(95.4,42.9) 95.4,39.152 ccw(c97.94,39.152) 96.144,37.356 98.156,35.344 ccw(c99.952,37.14) 99.952,34.6 102.017,34.6 ccw(c102.017,35.283) 102.5,34.8 ccw(c101.896,35.404) 102.75,35.404 R75.2@102.75,35.65
  Bottom Layer w0.245: v1(90.2,51.5) 90.564,51.136 cw(c89.027,49.6) 91.2,49.6 91.2,48.152 ccw(c93.74,48.152) 91.944,46.356 v1(95.4,42.9)
SDI_FPGA: JM2.91 R75.1 | length 2.6
  Top Layer w0.245: R75.1@102.75,36.55 JM2.91@102.75,39.15
SDI_VP: JM1.61 R80_U_double_preamp2.1 R124.1 | length 112.7
  Top Layer w0.25: R80_U_double_preamp2.1@20.6,78 v1(21.7,78) R124.1@22.95,78 ; v1(110,67.5) ccw(c109.396,68.104) 110.25,68.104 JM1.61@110.25,71.15
  Bottom Layer w0.25: v1(21.7,78) ccw(c21.7,78.966) 22.383,78.283 38.927,94.827 cw(c40.552,93.201) 40.552,95.5 61.948,95.5 cw(c61.948,92.96) 63.744,94.756 87.756,70.744 ccw(c89.552,72.54) 89.552,70 106.448,70 cw(c106.448,67.46) 108.244,69.256 v1(110,67.5)
SDO: R73.2 U7.2 | length 5.8
  Top Layer w0.245: U7.2@89.35,54.8 89.817,54.8 cw(c89.817,54.117) 90.3,54.6 90.517,54.383 cw(c89.834,53.7) 90.8,53.7 R73.2@90.8,50
SDO_FPGA: JM2.71 R73.1 | length 26.9
  Top Layer w0.245: R73.1@90.8,49.1 90.8,48.5 ccw(c92.6,48.5) 92.6,46.7 v1(95.8,46.7) ; v1(107.75,37.5) JM2.71@107.75,39.15
  Bottom Layer w0.245: v1(95.8,46.7) 103.04,46.7 cw(c103.04,44.466) 104.62,46.046 105.156,45.509 cw(c103.36,43.713) 105.9,43.713 105.9,40.166 ccw(c107.869,40.166) 106.477,38.773 v1(107.75,37.5)
SDO_VP: R8.1 R126.1 U2_U_double_preamp1.12 | length 156.5
  Top Layer w0.25: U2_U_double_preamp1.12@18.7,32.75 ccw(c18.7,32.85) 18.8,32.85 v1(18.8,34.7) ; v1(22.5,57) v1(24.3,57) ; R8.1@111.3,64.05 v1(111.3,64.9) R126.1@111.3,65.9
  Bottom Layer w0.25: v1(18.8,34.7) 18.8,36.648 cw(c21.099,36.648) 19.473,38.273 22.356,41.156 ccw(c20.56,42.952) 23.1,42.952 23.1,55.551 ccw(c21.051,55.551) v1(22.5,57) ; v1(24.3,57) 24.3,60.651 cw(c26.349,60.651) 24.9,62.1 ccw(c23.934,63.066) 25.3,63.066 25.3,78.748 cw(c27.84,78.748) 26.044,80.544 39.256,93.756 cw(c41.052,91.96) 41.052,94.5 61.548,94.5 cw(c61.548,91.96) 63.344,93.756 87.356,69.744 ccw(c89.152,71.54) 89.152,69 105.548,69 cw(c105.548,66.46) 107.344,68.256 110.488,65.112 ccw(c111,65.624) 111,64.9 v1(111.3,64.9)
START: R72.2 U7.53 | length 4.1
  Top Layer w0.245: 87.4,52.626 ccw(c88.368,52.626) 87.684,51.942 88.299,51.326 cw(c87.573,50.6) 88.6,50.6 R72.2@88.6,50 ; 87.4,52.628 U7.53@87.4,53.65
START_FPGA: JM2.75 R72.1 | length 28.2
  Top Layer w0.245: R72.1@88.6,49.1 88.6,48.4 ccw(c91.1,48.4) 91.1,45.9 v1(96.6,45.9) ; v1(106.75,37.5) JM2.75@106.75,39.15
  Bottom Layer w0.245: v1(96.6,45.9) 102.56,45.9 cw(c102.56,43.36) 105.1,43.36 105.1,39.8 ccw(c106.669,39.8) 105.56,38.69 v1(106.75,37.5)
SYNC_VP: JM1.49 U2_U_double_preamp1.14 U2_U_double_preamp2.14 | length 172.9
  Top Layer w0.25: v1(17.3,35.3) 17.3,34.755 ccw(c17.714,34.755) 17.421,34.462 cw(c17.111,34.151) 17.55,34.151 U2_U_double_preamp1.14@17.55,33.4 ; v1(17.3,71.3) 17.3,70.755 ccw(c17.714,70.755) 17.421,70.462 cw(c17.111,70.151) 17.55,70.151 U2_U_double_preamp2.14@17.55,69.4 ; v1(24.5,82) v1(28.5,82) ; v1(113.25,64.9) JM1.49@113.25,71.15
  Bottom Layer w0.25: v1(17.3,35.3) 17.3,40.748 cw(c19.84,40.748) 18.044,42.544 19.946,44.446 ; 19.947,44.447 cw(c20.8,43.593) 20.8,44.8 20.976,44.8 ccw(c20.976,45.824) 21.7,45.1 ccw(c20.734,46.066) 22.1,46.066 22.1,54.276 ccw(c21.076,54.276) 21.8,55 cw(c23.007,56.207) 21.3,56.207 21.3,57.393 cw(c23.007,57.393) 21.8,58.6 22.034,58.834 ccw(c20.669,60.2) 22.6,60.2 22.6,62.848 ccw(c20.06,62.848) 21.856,64.644 21.7,64.8 ccw(c20.493,63.593) 20.493,65.3 20.1,65.3 cw(c20.1,66.749) 19.076,65.724 19,65.8 cw(c19.724,66.524) 18.7,66.524 18.7,67.851 ccw(c16.651,67.851) 18.1,69.3 18.044,69.356 cw(c19.84,71.152) 17.3,71.152 v1(17.3,71.3) 17.3,77.31 cw(c19.69,77.31) 18,79 18.964,79.964 cw(c20.5,78.427) 20.5,80.6 22.048,80.6 ccw(c22.048,83.14) 23.844,81.344 v1(24.5,82) ; v1(28.5,82) 29,82.5 39.556,93.056 cw(c41.352,91.26) 41.352,93.8 61.248,93.8 cw(c61.248,91.26) 63.044,93.056 87.156,68.944 ccw(c88.952,70.74) 88.952,68.2 105.972,68.2 cw(c105.972,66.684) 107.044,67.756 110.317,64.483 ccw(c111,65.166) 111,64.2 111.56,64.2 ccw(c111.56,66.59) v1(113.25,64.9)
USB_D_N: D13.1 D13.10 J7.A7 J7.B7 JM3.50 | length 77
  Top Layer w0.23: J7.A7@92.25,93.1 92.25,93.75 cw(c92.6,93.75) 92.6,94.1 92.9,94.1 cw(c92.9,93.75) 93.25,93.75 J7.B7@93.25,93.1 ccw(c93.377,92.973) 93.198,92.973 93.198,88.655 ccw(c95.738,88.655) 93.941,86.859 98.5,82.3 v1(98.599,82.399) ; v1(125.7,52.162) cw(c125.84,52.162) 125.84,52.303 131.229,52.303 cw(c131.229,52.243) 131.271,52.285 132.066,52.285 cw(c132.066,52.166) JM3.50@132.15,52.25
  Bottom Layer w0.23: v1(98.599,82.399) ccw(c99.077,82.399) 98.739,82.061 101.556,79.244 ccw(c103.352,81.04) 103.352,78.5 110.5,78.5 cw(c110.5,76.186) 112.136,77.822 117.135,72.823 cw(c115.06,70.748) 117.995,70.748 117.995,59.335 ccw(c120.535,59.335) 120.535,56.795 127.2,56.795 cw(c127.2,55.2) 128.795,55.2 128.795,53.8 cw(c127.298,53.8) 127.298,52.302 125.84,52.302 ccw(c125.84,52.162) v1(125.7,52.162)
USB_D_P: D13.2 D13.9 J7.A6 J7.B6 JM3.48 | length 75.6
  Top Layer w0.23: J7.B6@91.75,93.1 91.75,92.35 ccw(c92,92.35) 92,92.1 92.803,92.1 ; J7.A6@92.75,93.1 cw(c92.623,92.973) 92.803,92.973 92.803,92.1 ; v1(98.122,81.922) 98.221,82.021 93.662,86.579 cw(c95.738,88.655) 92.803,88.655 92.803,92.1 ; v1(125.7,52.838) ccw(c125.84,52.838) 125.84,52.698 131.229,52.698 ccw(c131.229,52.757) 131.271,52.715 132.066,52.715 ccw(c132.066,52.834) JM3.48@132.15,52.75
  Bottom Layer w0.23: v1(98.122,81.922) cw(c98.122,81.444) 98.46,81.782 101.277,78.965 ccw(c103.352,81.04) 103.352,78.105 110.5,78.105 cw(c110.5,76.186) 111.857,77.543 116.856,72.544 cw(c115.06,70.748) 117.6,70.748 117.6,59.335 ccw(c120.535,59.335) 120.535,56.4 127.2,56.4 cw(c127.2,55.2) 128.4,55.2 128.4,53.8 cw(c127.298,53.8) 127.298,52.697 125.84,52.697 cw(c125.84,52.838) v1(125.7,52.838)
USB_VBUS: C67.2 D13.4 D13.5 D13.6 D13.7 J7.A4/B9 J7.B4/A9 JM3.56 | length 79.7
  Top Layer w0.23: v1(90.125,92.1) J7.B4/A9@90.125,93.1 ; C67.2@91.5,88.1 91.5,87.2 ccw(c93.19,87.2) 91.995,86.005 v1(97.1,80.9) ; v1(94.875,92.1) J7.A4/B9@94.875,93.1 ; v1(125.75,50.75) JM3.56@132.15,50.75
  Bottom Layer w0.23: v1(90.125,92.1) 90.125,89.975 ccw(c91,89.975) 91,89.1 v1(91.5,89.1) 94,89.1 ccw(c94,89.975) 94.875,89.975 v1(94.875,92.1) ; v1(97.1,80.9) 99.856,78.144 ccw(c101.652,79.94) 101.652,77.4 109.948,77.4 cw(c109.948,74.86) 111.744,76.656 116.356,72.044 cw(c114.56,70.248) 117.1,70.248 117.1,53.04 ccw(c119.39,53.04) 119.39,50.75 v1(125.75,50.75)
VOCM: C7_U_double_preamp1.1 C7_U_double_preamp2.1 C10_U_double_preamp1.1 C10_U_double_preamp2.1 C17_U_double_single_to_diff_conv1.2 C17_U_double_single_to_diff_conv2.2 C18_U_double_single_to_diff_conv1.1 C18_U_double_single_to_diff_conv2.1 C27_U_band_pass_diff_filter1.2 C27_U_band_pass_diff_filter2.2 C27_U_band_pass_diff_filter3.2 C27_U_band_pass_diff_filter4.2 C28_U_band_pass_diff_filter1.2 C28_U_band_pass_diff_filter2.2 C28_U_band_pass_diff_filter3.2 C28_U_band_pass_diff_filter4.2 C29_U_band_pass_diff_filter1.1 C29_U_band_pass_diff_filter2.1 C29_U_band_pass_diff_filter3.1 C29_U_band_pass_diff_filter4.1 C30_U_band_pass_diff_filter1.1 C30_U_band_pass_diff_filter2.1 C30_U_band_pass_diff_filter3.1 C30_U_band_pass_diff_filter4.1 C39_U_band_pass_diff_filter1.2 C39_U_band_pass_diff_filter2.2 C39_U_band_pass_diff_filter3.2 C39_U_band_pass_diff_filter4.2 C40_U_band_pass_diff_filter1.2 C40_U_band_pass_diff_filter2.2 C40_U_band_pass_diff_filter3.2 C40_U_band_pass_diff_filter4.2 C41_U_band_pass_diff_filter1.1 C41_U_band_pass_diff_filter2.1 C41_U_band_pass_diff_filter3.1 C41_U_band_pass_diff_filter4.1 C42_U_band_pass_diff_filter1.1 C42_U_band_pass_diff_filter2.1 C42_U_band_pass_diff_filter3.1 C42_U_band_pass_diff_filter4.1 C47.1 R12_U_double_preamp1.2 R12_U_double_preamp2.2 R13_U_double_preamp1.2 R13_U_double_preamp2.2 R14_U_double_preamp1.2 R14_U_double_preamp2.2 R16_U_double_preamp1.2 R16_U_double_preamp2.2 R17_U_double_preamp1.1 R17_U_double_preamp2.1 R19_U_double_preamp1.2 R19_U_double_preamp2.2 R22_U_double_single_to_diff_conv1.2 R22_U_double_single_to_diff_conv2.2 R29_U_double_single_to_diff_conv1.2 R29_U_double_single_to_diff_conv2.2 R41_U_band_pass_diff_filter1.2 R41_U_band_pass_diff_filter2.2 R41_U_band_pass_diff_filter3.2 R41_U_band_pass_diff_filter4.2 R42_U_band_pass_diff_filter1.2 R42_U_band_pass_diff_filter2.2 R42_U_band_pass_diff_filter3.2 R42_U_band_pass_diff_filter4.2 R50_U_band_pass_diff_filter1.2 R50_U_band_pass_diff_filter2.2 R50_U_band_pass_diff_filter3.2 R50_U_band_pass_diff_filter4.2 R51_U_band_pass_diff_filter1.2 R51_U_band_pass_diff_filter2.2 R51_U_band_pass_diff_filter3.2 R51_U_band_pass_diff_filter4.2 TP_VOCM.1 U4_U_double_single_to_diff_conv1.11 U4_U_double_single_to_diff_conv1.17 U4_U_double_single_to_diff_conv2.11 U4_U_double_single_to_diff_conv2.17 U7.46 | length 135.1
  Top Layer w0.2: C29_U_band_pass_diff_filter1.1@52.2,21.5 C41_U_band_pass_diff_filter1.1@52.2,22.5 ; C29_U_band_pass_diff_filter2.1@52.2,41.5 C41_U_band_pass_diff_filter2.1@52.2,42.5 ; C29_U_band_pass_diff_filter3.1@52.2,57.5 C41_U_band_pass_diff_filter3.1@52.2,58.5 ; C29_U_band_pass_diff_filter4.1@52.2,77.5 C41_U_band_pass_diff_filter4.1@52.2,78.5 ; 84.5,51.9 84.6,52 U7.46@84.6,53.65
  Top Layer w0.25: 20.9,28.4 ccw(c21,28.4) 21,28.3 22.7,28.3 ccw(c22.7,28.9) 23.3,28.9 23.3,29.8 cw(c23.85,29.8) 23.85,30.35 R29_U_double_single_to_diff_conv1.2@24.7,30.35 ; 20.9,64.4 ccw(c21,64.4) 21,64.3 22.7,64.3 ccw(c22.7,64.9) 23.3,64.9 23.3,65.8 cw(c23.85,65.8) 23.85,66.35 R29_U_double_single_to_diff_conv2.2@24.7,66.35 ; U4_U_double_single_to_diff_conv1.11@31.75,30.048 31.75,29.662 ccw(c32.262,29.662) 31.9,29.3 32.188,29.012 cw(c31.676,28.5) 32.4,28.5 C18_U_double_single_to_diff_conv1.1@32.4,27.4 ; U4_U_double_single_to_diff_conv2.11@31.75,66.048 31.75,65.662 ccw(c32.262,65.662) 31.9,65.3 32.188,65.012 cw(c31.676,64.5) 32.4,64.5 C18_U_double_single_to_diff_conv2.1@32.4,63.4 ; U4_U_double_single_to_diff_conv1.17@32.952,32.75 33.238,32.75 ccw(c33.238,33.262) 33.6,32.9 cw(c33.841,32.659) 33.841,33 C17_U_double_single_to_diff_conv1.2@34.5,33 ; U4_U_double_single_to_diff_conv2.17@32.952,68.75 33.238,68.75 ccw(c33.238,69.262) 33.6,68.9 cw(c33.841,68.659) 33.841,69 C17_U_double_single_to_diff_conv2.2@34.5,69
  Layer 2 w1: v1(19.7,64) v1(20.7,64) ccw(c20.7,65.69) 21.895,64.495 22.756,65.356 ccw(c20.96,67.152) 23.5,67.152 23.5,71.048 ccw(c20.96,71.048) 22.756,72.844 v1(21.4,74.2)
  Bottom Layer w0.5: v1(30.45,39.1) 34.656,34.894 cw(c32.86,33.098) 35.4,33.098 v1(35.4,33) ; v1(30.45,75.1) 34.656,70.894 cw(c32.86,69.098) 35.4,69.098 v1(35.4,69)
  Bottom Layer w1: v1(13.848,35.8) 12.944,34.896 ccw(c14.74,33.1) 12.2,33.1 v1(12.2,28.5) 12.2,27.49 ccw(c14.59,27.49) 12.9,25.8 13.876,24.824 ; v1(13.848,71.8) 12.944,70.896 ccw(c14.74,69.1) 12.2,69.1 v1(12.2,64.5) 12.2,63.49 ccw(c14.59,63.49) 12.9,61.8 13.876,60.824 ; 13.876,24.824 ccw(c14.9,25.849) v1(14.9,24.4) 29.248,24.4 ccw(c29.248,26.94) 31.044,25.144 v1(32.4,26.5) 34.656,28.756 ccw(c32.86,30.552) 35.4,30.552 v1(35.4,31) v1(35.4,33) ; 13.876,60.824 ccw(c14.9,61.849) v1(14.9,60.4) 19.048,60.4 ccw(c19.048,62.94) 20.844,61.144 v1(21.4,61.7) ; v1(19.7,28) v1(20.7,28) ; v1(21.4,38.2) 22.756,36.844 cw(c20.96,35.048) 23.5,35.048 23.5,31.152 ; v1(28.9,60.4) 29.248,60.4 ccw(c29.248,62.94) 31.044,61.144 v1(32.4,62.5) 34.656,64.756 ccw(c32.86,66.552) 35.4,66.552 v1(35.4,67) v1(35.4,69)
  other v1: 52.7,18.9 53.4,18.9 52.7,19.6 53.4,19.6 66.5,20 67.4,20 38.5,21.6 38.5,22.4 66.5,24 67.4,24 52.7,24.4 53.4,24.4 52.7,25.1 53.4,25.1 21.4,25.7 39.5,31 35.4,32 39.5,32 39.5,33 52.7,38.9 53.4,38.9 52.7,39.6 53.4,39.6 66.5,40 67.4,40 38.5,41.6 38.5,42.4 66.5,44 67.4,44 52.7,44.4 53.4,44.4 52.7,45.1 53.4,45.1 83.7,49.2 84.3,49.2 83.7,49.8 84.3,49.8 83.7,50.4 84.3,50.4 83.7,51 84.3,51 52.7,54.9 53.4,54.9 52.7,55.6 53.4,55.6 66.5,56 67.4,56 38.5,57.6 38.5,58.4 66.5,60 67.4,60 27.7,60.4 28.3,60.4 52.7,60.4 53.4,60.4 52.7,61.1 53.4,61.1 39.5,67 35.4,68 39.5,68 39.5,69 52.7,74.9 53.4,74.9 52.7,75.6 53.4,75.6 66.5,76 67.4,76 38.5,77.6 38.5,78.4 66.5,80 67.4,80 52.7,80.4 53.4,80.4 52.7,81.1 53.4,81.1
pads on no net: DES1.SP DES1.SP1 DES1.SP2 DES1.SP3 DES1.SP4 DES1.SP5 DES1.SP6 DES1.SP7 J1_U_MIC_connection1.MT J1_U_MIC_connection2.MT J1_U_MIC_connection3.MT J1_U_MIC_connection4.MT J2.12 J3.MH J4.MH J6.10 J6.MH1 J6.MH2 J7.A8 J7.B8 J7.MH JM1. JM1.13 JM1.18 JM1.20 JM1.22 JM1.24 JM1.26 JM1.28 JM1.32 JM1.34 JM1.36 JM1.38 JM1.42 JM1.44 JM1.46 JM1.48 JM1.50 JM1.52 JM1.57 JM1.59 JM1.66 JM1.68 JM1.70 JM1.72 JM1.76 JM1.78 JM1.82 JM1.84 JM1.85 JM1.86 JM1.87 JM1.88 JM1.91 JM1.92 JM1.93 JM1.94 JM1.95 JM1.96 JM1.97 JM1.98 JM1.99 JM1.100 JM2. JM2.12 JM2.13 JM2.14 JM2.15 JM2.16 JM2.18 JM2.21 JM2.22 JM2.23 JM2.24 JM2.25 JM2.26 JM2.27 JM2.28 JM2.31 JM2.32 JM2.33 JM2.34 JM2.36 JM2.37 JM2.38 JM2.42 JM2.43 JM2.44 JM2.46 JM2.47 JM2.48 JM2.53 JM2.54 JM2.57 JM2.58 JM2.63 JM2.64 JM2.67 JM2.68 JM2.73 JM2.74 JM2.77 JM2.78 JM2.83 JM2.84 JM2.86 JM2.87 JM2.88 JM2.90 JM2.93 JM2.97 JM2.99 JM3. JM3.1 JM3.2 JM3.3 JM3.4 JM3.7 JM3.8 JM3.9 JM3.10 JM3.13 JM3.14 JM3.15 JM3.16 JM3.19 JM3.20 JM3.21 JM3.22 JM3.25 JM3.27 JM3.28 JM3.31 JM3.32 JM3.33 JM3.34 JM3.37 JM3.38 JM3.39 JM3.40 JM3.41 JM3.42 JM3.43 JM3.44 JM3.47 JM3.49 JM3.51 JM3.52 JM3.53 JM3.54 JM3.57 JM3.58 JM3.59 JM3.60 U15.14 U15.16 U15.17 U15.19 U15.23 U15.28
copper on no net: | length 112.1
  Top Layer w0.75: 14.8,7.6 14.8,8 ; 21.4,11.3 51.3,11.3 cw(c51.3,10.3) 52.3,10.3 52.3,7.6 52.3,5.3 cw(c51.2,5.3) 51.2,4.2 ; 45.6,11.3 15.7,11.3 ccw(c15.7,10.3) 14.7,10.3 14.7,7.6 14.7,5.3 ccw(c15.8,5.3) 15.8,4.2 51.1,4.2
  other v1: 116,40.5

## Polygon pours and split planes (outlines as drawn)
GND on Top Layer "GND_L01_P398" (solid, remove dead copper, pour order 398): 36,99 10.5,99 ccw(c10.5,89.5) 1,89.5 1,10.5 ccw(c10.5,10.5) 10.5,1 36,1
GND on Top Layer "Top Layer-GND" (solid, remove dead copper, pour order 397): 73,1 139.5,1 ccw(c139.5,10.5) 149,10.5 149,89.5 ccw(c139.5,89.5) 139.5,99 130.8,99 ccw(c130.8,97.2) 129,97.2 129,83 cw(c126,83) 126,80 108,80 cw(c108,83) 105,83 105,97.2 ccw(c103.2,97.2) 103.2,99 73,99
1.8VD on Top Layer "1.8VD_L01_P269" (solid, pour order 269): 123.3,41.9 123.7,41.9 ccw(c123.7,42.1) 123.9,42.1 123.9,46.2 ccw(c123.7,46.2) 123.7,46.4 123.1,46.4 122.2,46.4 ccw(c122.2,46.2) 122,46.2 122,45.2 ccw(c122.2,45.2) 122.2,45 122.9,45 cw(c122.9,44.8) 123.1,44.8 123.1,42.1 ccw(c123.3,42.1)
3.3VD on Top Layer "3.3VD_L01_P135" (solid, pour order 135): 33.5,37.7 33.5,37.4 cw(c33.2,37.4) 33.2,37.1 30.8,37.1 cw(c30.8,37.4) 30.5,37.4 30.5,37.7 cw(c30.8,37.7) 30.8,38 33.2,38 cw(c33.2,37.7)
GND on Top Layer "GND_L01_P450" (solid, remove dead copper, pour order 450): 18 vertices, not listed, extent 33.6,1 74.5,25.4
GND on Top Layer "GND_L01_P449" (solid, remove dead copper, pour order 449): 18 vertices, not listed, extent 33.6,74.6 74.5,99
GND on Top Layer "GND_L01_P447" (solid, remove dead copper, pour order 447): 27 vertices, not listed, extent 33.6,22 74.5,44.5
GND on Top Layer "GND_L01_P446" (solid, remove dead copper, pour order 446): 27 vertices, not listed, extent 33.6,58 74.5,80.5
GND on Top Layer "GND_L01_P399" (solid, pour order 399): 27 vertices, not listed, extent 35,40 74.5,60.5
ETH_GND on Top Layer "ETH_GND_L01_P092" (solid, pour order 92): 108,99.5 126,99.5 cw(c126,97) 128.5,97 128.5,83 cw(c126,83) 126,80.5 108,80.5 cw(c108,83) 105.5,83 105.5,97 cw(c108,97)
1.8VD on Top Layer "1.8VD_L01_P178" (solid, pour order 178): 17 vertices, not listed, extent 116.7,23.6 121.1,33.6
5VA on Top Layer "5VA_L01_P094" (solid, pour order 94): 84.55,60 85.45,60 ccw(c85.45,60.05) 85.5,60.05 85.5,61.1 85.5,64.8 ccw(c85.2,64.8) 85.2,65.1 82.3,65.1 ccw(c82.3,64.8) 82,64.8 82,64.2 ccw(c82.3,64.2) 82.3,63.9 84.3,63.9 cw(c84.3,63.7) 84.5,63.7 84.5,60.05 ccw(c84.55,60.05)
5VA on Top Layer "5VA_L01_P006" (solid, pour order 6): 85.75,54 86.25,54 cw(c86.25,53.95) 86.3,53.95 86.3,48.5 cw(c86,48.5) 86,48.2 85.2,48.2 cw(c85.2,48.5) 84.9,48.5 84.9,51.7 cw(c85.2,51.7) 85.2,52 85.4,52 ccw(c85.4,52.3) 85.7,52.3 85.7,53.95 cw(c85.75,53.95)
3.3VD on Top Layer "3.3VD_L01_P000" (solid, pour order 0): 79.905,87.072 79.905,85.105 cw(c79.6,85.105) 79.6,84.8 77.6,84.8 cw(c77.6,85.1) 77.3,85.1 77.3,85.3 cw(c77.6,85.3) 77.6,85.6 79.3,85.6 ccw(c79.3,85.895) 79.595,85.895 79.595,87.072 cw(c79.673,87.072) 79.673,87.15 79.827,87.15 cw(c79.827,87.072)
3.3VD on Top Layer "3.3VD_L01_P097" (solid, pour order 97): 101.305,92.372 101.305,90.405 cw(c101,90.405) 101,90.1 99,90.1 cw(c99,90.4) 98.7,90.4 98.7,90.6 cw(c99,90.6) 99,90.9 100.7,90.9 ccw(c100.7,91.195) 100.995,91.195 100.995,92.372 cw(c101.073,92.372) 101.073,92.45 101.227,92.45 cw(c101.227,92.372)
5VD on Top Layer "5VD_L01_P001" (solid, pour order 1): 116.75,24.85 117.25,24.85 ccw(c117.25,25.1) 117.5,25.1 117.5,27.4 cw(c117.8,27.4) 117.8,27.7 118.8,27.7 cw(c118.8,27.4) 119.1,27.4 119.1,24.8 cw(c118.85,24.8) 118.85,24.55 116.75,24.55 cw(c116.75,24.6) 116.7,24.6 116.7,24.8 cw(c116.75,24.8)
5VD on Top Layer "5VD_L01_P177" (solid, pour order 177): 17 vertices, not listed, extent 112.3,18.7 117.9,23.61
3.3VD on Top Layer "3.3VD_L01_P268" (solid, pour order 268): 20 vertices, not listed, extent 114,24.991 117.2,34.5
5VIN on Top Layer "5VIN_L01_P159" (solid, pour order 159): 30 vertices, not listed, extent 116.7,5.2 137.5,24.5
5VA on Top Layer "5VA_L01_P002" (solid, pour order 2): 29.408,32.312 29.408,31.688 cw(c29.345,31.688) 29.345,31.625 28.602,31.625 ccw(c28.602,30.957) 28.129,31.429 cw(c27.817,31.741) 27.817,31.3 25.7,31.3 cw(c25.7,31.6) 25.4,31.6 25.4,32.4 cw(c25.7,32.4) 25.7,32.7 27.817,32.7 cw(c27.817,32.259) 28.129,32.571 ccw(c28.601,33.043) 28.601,32.375 29.345,32.375 cw(c29.345,32.312)
5VA on Top Layer "5VA_L01_P003" (solid, pour order 3): 29.408,68.312 29.408,67.688 cw(c29.345,67.688) 29.345,67.625 28.602,67.625 ccw(c28.602,66.957) 28.129,67.429 cw(c27.817,67.741) 27.817,67.3 25.7,67.3 cw(c25.7,67.6) 25.4,67.6 25.4,68.4 cw(c25.7,68.4) 25.7,68.7 27.817,68.7 cw(c27.817,68.259) 28.129,68.571 ccw(c28.601,69.043) 28.601,68.375 29.345,68.375 cw(c29.345,68.312)
5VA on Top Layer "NONET_L03_P-001" (solid, pour order 4): 17 vertices, not listed, extent 30.4,26.6 31.6,30.408
5VA on Top Layer "NONET_L03_P-001" (solid, pour order 5): 17 vertices, not listed, extent 30.4,62.6 31.6,66.408
5VA on Top Layer "5VA_L01_P453" (solid, pour order 453): 17 vertices, not listed, extent 18.39,66.1 21.8,69
5VA on Top Layer "5VA_L01_P124" (solid, pour order 124): 17 vertices, not listed, extent 18.39,30.1 21.8,33
GND on Top Layer "NONET_L03_P-001" (solid, pour order 452): 86.3,60 85.7,60 85.7,61.6 cw(c85.9,61.6) 85.9,61.8 86.1,61.8 cw(c86.1,61.6) 86.3,61.6
GND on Top Layer "NONET_L03_P-001" (solid, pour order 451): 84.9,54 85.5,54 85.5,52.4 cw(c85.3,52.4) 85.3,52.2 85.1,52.2 cw(c85.1,52.4) 84.9,52.4
VOCM on Top Layer "VOCM_L01_P007" (solid, pour order 7): 83.541,51.841 84.259,52.559 ccw(c83.676,53.141) 84.5,53.141 84.5,53.5 84.7,53.5 84.7,53 84.7,51.8 84.7,43.1 cw(c84.4,43.1) 84.4,42.8 83.6,42.8 cw(c83.6,43.1) 83.3,43.1 83.3,51.259 cw(c84.124,51.259)
NetC50_1 on Top Layer "NETC50_1_L01_P093" (solid, pour order 93): 84.25,60 83.75,60 cw(c83.75,60.05) 83.7,60.05 83.7,61.4 ccw(c83.4,61.4) 83.4,61.7 82.3,61.7 cw(c82.3,62) 82,62 82,63.4 cw(c82.3,63.4) 82.3,63.7 84,63.7 cw(c84,63.4) 84.3,63.4 84.3,60.05 cw(c84.25,60.05)
NetC62_2 on Top Layer "NETC62_2_L01_P151" (solid, pour order 151): 36 vertices, not listed, extent 99.6,24.4 107.3,31.2
1.8VD on Top Layer "1.8VD_L01_P095" (solid, pour order 95): 20 vertices, not listed, extent 86.9,60 90.2,63.5